# Allegro board T527-DEMO-AXP717B-LPDDR4-32X1-V1-0_1213.brd

Outline 246.2 x 143.31 mm; copper layers: TOP, L2GND, L3, L4, L5GND, BOTTOM. Coordinates in mm from the lower left corner of the outline.
Outline path: 0,141.78 0,1.52 ; 0,141.78 arc(0.45,142.86) 1.52,143.31 199.51,143.31 ; 0,141.78 0,1.52 ; 0,1.52 arc(0.45,0.45) 1.52,0 ; 1.52,0 244.68,0 ; 1.52,0 244.68,0 ; 244.68,0 arc(245.75,0.45) 246.2,1.52 ; 244.68,0 arc(245.75,0.45) 246.2,1.52 ; 199.51,143.31 198.85,143.31 ; 199.51,143.31 199.51,139.11 ; 209.68,143.31 244.68,143.31 ; 244.68,143.31 arc(245.75,142.86) 246.2,141.78 ; 244.68,143.31 arc(245.75,142.86) 246.2,141.78 ; 246.2,141.78 246.2,1.52 ; 246.2,141.78 246.2,1.52

## Design rules (mm)
net group 3V3-STBY: nets EXT-3V3 N23534299
net group ALDO-OUT: nets ALDO-OUT VRP
net group AUDIO-MUTE: nets AUDIO-MUTE S-AMP-MUTE
net group AUDIO-PWR-EN: nets AUDIO-PWR-EN N20492605
net group BLDO2: nets BLDO2 N22958105
net group CLKOUT-125M: nets CLKOUT-125M RGMII0-CLKIN-125M
net group CTP0-RST: nets CTP0-RST N19388835
net group CTP1-RST: nets CTP1-RST N20736023
net group DCXO-XOUT: nets DCXO-XOUT N16421057
net group DIFFPAIR44: nets USB3-TXN USB3-TXP
net group DIFFPAIR96: nets SPKL+ SPKL-
net group DIFFPAIR97: nets SPKR+ SPKR-
net group DIFFPAIR101: nets LINEINL LINEINR
net group DIFFPAIR102: nets MICIN2N-AC107 MICIN2P-AC107
net group DP-AUXN-1: nets DP-AUXN-1 EDP-AUXN
net group DP-AUXP-1: nets DP-AUXP-1 EDP-AUXP
net group DP-TX0N-1: nets DP-TX0N-1 EDP-TX0N
net group DP-TX0P-1: nets DP-TX0P-1 EDP-TX0P
net group DP-TX1N-1: nets DP-TX1N-1 EDP-TX1N
net group DP-TX1P-1: nets DP-TX1P-1 EDP-TX1P
net group DP-TX2N-1: nets DP-TX2N-1 EDP-TX2N
net group DP-TX2P-1: nets DP-TX2P-1 EDP-TX2P
net group DP-TX3N-1: nets DP-TX3N-1 EDP-TX3N
net group DP-TX3P-1: nets DP-TX3P-1 EDP-TX3P
net group DVDD: nets DVDD VCC-1V8-AUDIO
net group EPHY-CLK-25M: nets EPHY-CLK-25M XTAL-25MOUT
net group HUB-IN-DM: nets HUB-IN-DM USB1-DM
net group HUB-IN-DP: nets HUB-IN-DP USB1-DP
net group HUB-XOUT: nets HUB-XOUT N23982160
net group I2S2-MCLK: nets I2S2-MCLK N20684047
net group LCD0-BL-PWREN: nets LCD0-BL-PWREN N19388067
net group LCD1-BL-PWREN: nets LCD1-BL-PWREN N19393896
net group LED0/CFG-EXT: nets LED0/CFG-EXT N19421144
net group LED1/CFG-LDO0: nets LED1/CFG-LDO0 N19421140
net group LED2/CFG-LDO1: nets LED2/CFG-LDO1 N19421205
net group M-PWRON-AP: nets M-PWRON-AP PWRON
net group MCSIA-MCLK: nets MCSIA-MCLK N19709323
net group MCSIC-MCLK: nets MCSIC-MCLK N17807603
net group MDC: nets MDC RGMII0-MDC
net group MDIO: nets MDIO RGMII0-MDIO
net group NRE: nets N17079515 NRE
net group PCIE21-TDN: nets N21159878 PCIE21-TDN
net group PCIE21-TDP: nets N21159841 PCIE21-TDP
net group RGMII0-TXCK: nets RGMII0-TXCK TXC
net group RGMII0-TXCTL: nets RGMII0-TXCTL TXCTL
net group RGMII0-TXD0: nets RGMII0-TXD0 TXD0
net group RGMII0-TXD1: nets RGMII0-TXD1 TXD1
net group RGMII0-TXD2: nets RGMII0-TXD2 TXD2
net group RGMII0-TXD3: nets RGMII0-TXD3 TXD3
net group SDC0-CLK: nets N17806711 SDC0-CLK
net group VCC33-18-USB: nets VCC33-18-USB VCC33-USB
net group VCC-ADC: nets VCC-ADC VREFP-ADC
net group VCC-FLASH: nets VCC-FLASH VCC-PC
net group VCC-PD: nets VCC-PD VCCIO-LCD0
net group VCC-PJ: nets VCC-PJ VCCIO-LCD1
net group WIFI-XTAL-OUT: nets N16813673 WIFI-XTAL-OUT
net group WL-SDIO-CLK: nets N18665573 WL-SDIO-CLK
net group WREQIN: nets N17685568 WREQIN
net group 4-4: nets LINEOUT-DSP-LN LINEOUT-DSP-LP LINEOUT-DSP-RN LINEOUT-DSP-RP LINEOUTLN LINEOUTLP LINEOUTRN LINEOUTRP MICIN1N MICIN1N-AC107 MICIN1N-MIC MICIN1P MICIN1P-AC107 MICIN1P-MIC MICIN2N MICIN2N-MIC MICIN2P MICIN2P-MIC MICIN3N MICIN3P
net group ANT0: nets ANT0 N16794099 N16811138 N16811149 N16811502
net group AP-CK24M-OUT: nets AP-CK24M-OUT N16800403 XTAL2
net group AP-CK32K-OUT: nets AP-CK32K-OUT LPCLK N16805924
net group BUSJ: nets BUSJ VBUSM VD33 XRSTJ
net group DIFF90: nets D+ D- HUB-DM1 HUB-DM2 HUB-DM3 HUB-DM4 HUB-DP1 HUB-DP2 HUB-DP3 HUB-DP4 N17311481 N17311494 N23159079 N23159094 N23159172 N23159176 USB0-DM USB0-DP USB2-DM USB2-DP USB3-RXN USB3-RXP USB3-TXN-1 USB3-TXP-1
net group DIFF100: nets N19462537 N19462549 N19462627 N19462788 N20900734 N20900736 N20900899 N20900901 N20913593 N20913596 N22323807 U3-PCIE21-RXN U3-PCIE21-RXP U3-PCIE21-TXN U3-PCIE21-TXP
net group DVDDRG: nets DVDDRG RGMII0-RXCK RGMII0-RXCTL RGMII0-RXD0 RGMII0-RXD1 RGMII0-RXD2 RGMII0-RXD3 RXC/PHYAD1 RXCTL/PHYAD2 RXD0/RXDLY RXD1/TXDLY RXD2/PLLOFF RXD3/PHYAD0
net group HDMI: nets HTX0N HTX0P HTX1N HTX1P HTX2N HTX2P HTXCN HTXCP
net group HPOUTL: nets HPOUTL N20133630 N21757000
net group HPOUTR: nets HPOUTR N20133649 N21756998
net group LTE-PWR: nets N19376562
net group LVDS1_D: nets LVDS1-CKN LVDS1-CKP LVDS1-D1N LVDS1-D1P LVDS1-D2N LVDS1-D2P LVDS1-D3N LVDS1-D3P
net group LVDS3_D: nets LVDS3-CKN LVDS3-CKP LVDS3-D1N LVDS3-D1P LVDS3-D2N LVDS3-D2P LVDS3-D3N LVDS3-D3P
net group MCSIA_D: nets MCSIA-CKN MCSIA-CKP MCSIA-D0N MCSIA-D0P MCSIA-D1N MCSIA-D1P MCSIB-D0N MCSIB-D0P MCSIB-D1N MCSIB-D1P
net group MCSID_D: nets MCSIC-CKN MCSIC-CKP MCSIC-D0N MCSIC-D0P MCSIC-D1N MCSIC-D1P MCSID-D0N MCSID-D0P MCSID-D1N MCSID-D1P
net group N16811571: nets N16811571 N16811677 N16811938
net group NCSI-D8: nets N20492599 N20684050 PCMCLK
net group NCSI-D9: nets N20492596 N20683982 PCMSYNC
net group NCSI-D10: nets N20492590 N20683985 PCMDOUT
net group NCSI-D11: nets N20492593 N22106739 PCMDI
net group PCIE21-REFCLKN: nets N18188508 N19487540 PCIE21-REFCLKN
net group PCIE21-REFCLKP: nets N18188505 N19487538 PCIE21-REFCLKP
net group PCIE-M2-RDN: nets PCIE21-RDN PCIE21-RDN-R PCIE-M2-RDN
net group PCIE-M2-RDP: nets PCIE21-RDP PCIE21-RDP-R PCIE-M2-RDP
net group SW-OUT: nets N17877662
net group VCC-3V3-PCIE: nets N19487589
net group VCC-CTP: nets VCC-CTP VCC-CTP0 VCC-CTP1

## Placement (name value [footprint] x y rotation side)
ANT3  GPS-ANT  [ANT3B300_310H125]  119.38 140.97 180 top
ANT4  NC/Antenna_SW4_SMD  [SMA5B700_1500H986]  27.05 142.37 0 top
ANT5  NC/Antenna_SW4_SMD  [SMA5B700_1500H986]  17.27 142.37 0 top
B1  600R-100M  [L0603]  74.42 132.08 270 bottom
B2  600R-100M  [L0603]  73.15 137.03 90 top
B3  600R-100M  [L0603]  71.75 137.03 90 top
B4  600R-100M  [L0603]  63.12 137.03 90 top
B5  600R-100M  [L0603]  61.72 137.03 90 top
BT1  test  [TP100]  9.4 125.31 0 top
BT2  test  [TP100]  9.45 127.81 0 top
BT3  test  [TP100]  9.48 122.62 0 top
BT4  NC/CR2032-8  [CR2B2000_2850H550]  39.22 89.51 90 bottom
C1  2.2uF  [C0402]  125.63 77.29 90 bottom
C2  100nF  [C0402]  124.8 77.29 90 bottom
C3  22uF  [C0603]  142.37 66.93 225 bottom
C4  4.7uF  [C0402]  133.73 75.61 90 bottom
C5  4.7uF  [C0402]  135.8 75.76 90 bottom
C6  2.2uF  [C0402]  132.86 75.6 90 bottom
C7  100nF  [C0402]  140.99 74.92 90 bottom
C8  22uF  [C0603]  144.18 74.57 45 bottom
C9  2.2uF  [C0402]  136.2 69.04 180 bottom
C10  100nF  [C0402]  134.99 75.76 90 bottom
C11  22uF  [C0603]  132.21 62.61 180 bottom
C12  22uF  [C0603]  132.21 63.88 180 bottom
C13  4.7uF  [C0402]  132.33 66.89 180 bottom
C14  4.7uF  [C0402]  132.05 75.39 90 bottom
C15  2.2uF  [C0402]  131.15 73.81 180 bottom
C16  2.2uF  [C0402]  131.24 75.46 90 bottom
C17  100nF  [C0402]  136.17 67.73 0 bottom
C18  100nF  [C0402]  132.32 65.9 180 bottom
C19  100nF  [C0402]  139.19 56.39 270 bottom
C20  100nF  [C0402]  111.51 73.53 0 top
C21  1uF  [C0402]  109.6 70.1 270 top
C22  100nF  [C0402]  111.51 72.14 0 top
C23  1nF  [C0402]  111.12 86.23 0 top
C24  1nF  [C0402]  112.9 82.68 90 top
C25  22uF  [C0603]  140.79 81.14 90 bottom
C26  2.2uF  [C0402]  135.69 78.91 90 bottom
C27  2.2uF  [C0402]  136.53 78.92 90 bottom
C28  100nF  [C0402]  140.88 77.64 270 bottom
C29  100nF  [C0402]  133.51 76.97 180 bottom
C30  18pF-C0G  [C0402]  117.35 81.53 90 top
C31  22pF-C0G  [C0402]  116.46 83.57 180 top
C32  22uF  [C0603]  141.29 83.96 180 bottom
C33  100nF  [C0402]  140.38 82.92 180 bottom
C34  18pF-C0G  [C0402]  117.35 79.63 270 top
C35  22pF-C0G  [C0402]  116.33 86.49 0 top
C36  22uF  [C0603]  138.9 66.61 225 bottom
C37  100nF  [C0402]  138.18 67.33 225 bottom
C38  22uF  [C0603]  131.19 91.31 180 bottom
C39  2.2uF  [C0402]  131.19 90.17 180 bottom
C40  2.2uF  [C0402]  133.5 79.55 315 bottom
C41  100nF  [C0402]  132.87 78.3 270 bottom
C42  100nF  [C0402]  134.24 80.31 315 bottom
C43  22uF  [C0603]  117.09 82.04 90 bottom
C44  2.2uF  [C0402]  131.19 78.48 0 bottom
C45  2.2uF  [C0402]  131.2 77.21 0 bottom
C46  100nF  [C0402]  129.88 77.08 270 bottom
C47  100nF  [C0402]  130.98 79.99 0 bottom
C49  10uF  [C0402]  135.84 71.7 270 bottom
C50  100nF  [C0402]  140.72 64.26 135 bottom
C51  100nF  [C0402]  141.6 65.15 135 bottom
C54  100nF  [C0402]  137.54 96.01 90 bottom
C55  1uF  [C0402]  147.83 82.04 270 bottom
C56  100nF  [C0402]  146.56 82.3 270 bottom
C57  100nF  [C0402]  136.55 83.87 90 bottom
C58  100nF  [C0402]  149.86 81.15 90 bottom
C59  100nF  [C0402]  123.92 75.88 270 bottom
C60  10uF  [C0603]  135.51 90.3 180 bottom
C61  100nF  [C0402]  133.73 89.66 90 bottom
C62  100nF  [C0402]  135.49 83.92 90 bottom
C64  100nF  [C0402]  121.82 82.85 315 bottom
C65  100nF  [C0402]  122.56 86.11 45 bottom
C66  2.2uF  [C0402]  127.8 81.14 270 bottom
C67  2.2uF  [C0402]  125.31 83.34 225 bottom
C68  470nF  [C0402]  130.52 83.38 180 bottom
C69  2.2uF  [C0402]  130.99 84.73 270 bottom
C70  2.2uF  [C0402]  128.75 84.91 270 bottom
C71  470nF  [C0402]  125.66 86.03 135 bottom
C72  470nF  [C0402]  125.09 85.45 135 bottom
C73  470nF  [C0402]  127.69 84.89 270 bottom
C74  10uF  [C0603]  124.8 81.71 315 bottom
C75  2.2uF  [C0402]  124.74 83.91 225 bottom
C76  100nF  [C0402]  147.03 74.75 225 bottom
C77  100nF  [C0402]  151.47 74.12 45 bottom
C78  100nF  [C0402]  142.51 76.34 315 bottom
C79  1uF  [C0402]  151.38 77.47 90 bottom
C80  1uF  [C0402]  153.16 76.71 90 bottom
C81  100nF  [C0402]  154.05 76.71 90 bottom
C82  100nF  [C0402]  152.27 77.47 90 bottom
C83  1uF  [C0402]  148.34 79.76 90 bottom
C84  1uF  [C0402]  147.45 79.76 90 bottom
C85  100nF  [C0402]  145.67 79.76 90 bottom
C86  100nF  [C0402]  146.56 79.76 90 bottom
C87  1uF  [C0402]  141.22 59.94 180 bottom
C88  1uF  [C0402]  141.22 59.05 180 bottom
C89  100nF  [C0402]  141.22 60.83 180 bottom
C90  100nF  [C0402]  141.22 61.72 180 bottom
C91  1uF  [C0402]  143.55 60.83 0 bottom
C92  1uF  [C0402]  143.55 59.05 0 bottom
C93  100nF  [C0402]  143.55 59.94 0 bottom
C94  100nF  [C0402]  143.55 61.72 0 bottom
C95  1uF  [C0402]  152.26 68.39 45 bottom
C96  1uF  [C0402]  152.89 67.76 45 bottom
C97  100nF  [C0402]  153.52 67.13 45 bottom
C98  100nF  [C0402]  151.64 69.02 45 bottom
C99  1uF  [C0402]  148.25 71.96 135 bottom
C100  1uF  [C0402]  150.32 71.17 315 bottom
C101  100nF  [C0402]  149.69 70.53 315 bottom
C102  100nF  [C0402]  148.89 72.6 135 bottom
C103  100nF  [C0402]  135.25 13.34 270 top
C104  100nF  [C0402]  133.48 13.34 270 top
C105  100nF  [C0402]  134.37 13.34 270 top
C106  100nF  [C0402]  132.59 13.34 270 top
C107  100nF  [C0402]  131.7 13.34 270 top
C108  100nF  [C0402]  130.81 13.34 270 top
C109  100nF  [C0402]  129.92 13.34 270 top
C110  100nF  [C0402]  129.03 13.34 270 top
C111  100nF  [C0402]  137.03 13.34 270 top
C112  100nF  [C0402]  137.92 13.34 270 top
C113  4.7uF  [C0603]  142.24 11.43 90 top
C117  1nF  [C0402]  84.2 26.16 270 top
C118  10nF  [C0402]  132.2 85.59 270 bottom
C119  1nF  [C0402]  133.56 84.58 180 bottom
C133  2.2uF  [C0402]  128.4 96.39 270 top
C134  100nF  [C0402]  154.81 72.26 0 top
C135  100nF  [C0402]  154.81 71.37 0 top
C139  100nF  [C0402]  145.59 73.79 315 bottom
C140  100nF  [C0402]  143.78 75.74 225 bottom
C142  100nF  [C0402]  184.78 45.85 180 top
C143  NC/4.7uF  [C0603]  51.94 129.16 0 top
C144  NC/4.7uF  [C0603]  51.94 127.89 0 top
C150  10uF  [C0603]  43.94 112.65 180 top
C151  100nF  [C0402]  43.94 113.79 180 top
C152  1uF  [C0402]  40.89 110.24 270 top
C153  NC-100nF  [C0402]  35.81 32.26 90 top
C154  100nF-50V  [C0603]  36.07 14.86 90 top
C155  100nF-50V  [C0402]  32.89 21.08 270 top
C156  NC-100nF-25V  [C0402]  39.12 36.58 270 top
C157  NC-100nF-25V  [C0402]  73.91 50.93 0 top
C158  100nF  [C0402]  61.72 27.56 180 top
C159  100nF  [C0402]  59.56 24.26 90 top
C160  NC-100nF-25V  [C0402]  40.01 34.67 90 top
C163  10uF-16V  [C0805]  91.82 12.83 90 top
C164  100nF-16V  [C0402]  90.42 12.95 90 top
C242  NC-1nF-50V  [C0402]  45.47 36.96 0 top
C402  0.1uF  [C0402]  10.54 69.85 90 top
C403  0.1uF  [C0402]  100.84 57.15 0 top
C404  0.22uF  [C0402]  11.94 60.2 180 top
C405  0.1uF  [C0402]  9.4 69.85 90 top
C406  0.1uF  [C0402]  8.38 69.85 90 top
C407  0.1uF  [C0402]  7.49 69.85 270 top
C438  100nF  [C0402]  78.49 138.94 90 top
C439  100nF  [C0402]  138.99 84.01 0 bottom
C440  100nF  [C0402]  130.56 58.8 180 top
C441  100nF  [C0402]  120.78 82.68 315 bottom
C442  10uF-50V  [C0603]  171.58 78.99 270 top
C443  1uF-50V  [C0402]  172.72 78.99 270 top
C446  100nF  [C0402]  200.66 52.58 270 top
C447  100nF  [C0402]  201.8 52.58 270 top
C448  NC/224  [C0402]  95.63 57.15 0 top
C449  100nF-16V  [C0402]  54.99 99.57 90 top
C450  18pF  [C0402]  63.75 103.63 90 top
C451  18pF  [C0402]  63.75 99.82 270 top
C452  4.7uF  [C0603]  54.48 28.19 90 top
C453  100nF  [C0402]  42.67 26.04 0 bottom
C454  100nF  [C0402]  48.9 24.38 270 bottom
C455  100nF  [C0402]  48.13 16.64 0 top
C456  1uF  [C0402]  51.82 25.78 0 top
C457  20pF  [C0402]  51.82 24.64 0 top
C458  4.7uF  [C0603]  41.02 20.95 270 bottom
C459  100nF  [C0402]  51.82 19.56 180 top
C460  100nF  [C0402]  48.13 17.53 180 top
C461  1uF  [C0402]  49.78 24.38 90 bottom
C462  100nF  [C0402]  42.67 27.3 180 bottom
C463  4.7uF  [C0603]  54.86 127.89 180 top
C464  4.7uF  [C0603]  54.86 129.16 180 top
C465  1nF  [C0402]  147.57 78.36 0 bottom
C466  100nF  [C0402]  178.56 15.11 270 top
C467  100nF  [C0402]  179.45 15.11 270 top
C468  1nF  [C0402]  84.33 39.37 0 top
C469  100nF  [C0402]  226.19 137.54 180 top
C470  4.7uF  [C0603]  225.93 136.4 180 top
C471  10uF-16V  [C0603]  146.81 11.18 0 top
C472  1uF-16V  [C0402]  146.81 10.03 0 top
C473  1uF-50V  [C0402]  186.06 77.72 270 top
C474  10uF-50V  [C0603]  187.2 77.72 270 top
C475  100nF  [C0402]  186.56 71.88 0 top
C476  4.7uF  [C0603]  186.18 73.79 90 top
C477  4.7uF  [C0603]  170.31 74.3 180 top
C478  100nF  [C0402]  170.81 73.28 180 top
C479  100nF  [C0402]  141.1 11.18 270 top
C480  1uF  [C0402]  150.16 116.59 180 top
C481  10uF  [C0603]  146.2 112.62 270 top
C482  100nF  [C0402]  147.24 112.65 270 top
C483  1uF  [C0402]  220.65 47.68 270 top
C484  10uF  [C0603]  222.88 43.94 270 top
C485  100nF  [C0402]  224.92 44.32 270 top
C486  10uF  [C0603]  147.8 120.7 180 top
CA1  1uF  [C0402]  102.36 132.46 270 top
CA2  33pF  [C0402]  103.76 135.64 180 top
CA5  100nF  [C0402]  88.65 126.75 180 top
CA6  100nF  [C0402]  92.58 126.75 0 top
CA7  100nF  [C0402]  104.27 132.46 90 top
CA8  10uF  [C0603]  104.65 133.86 180 bottom
CA9  100pF  [C0402]  104.78 134.75 180 top
CA10  100nF  [C0402]  105.28 132.46 90 top
CA11  33pF  [C0402]  105.66 135.64 180 top
CA13  1uF  [C0402]  96.01 132.46 270 top
CA17  33pF  [C0402]  97.41 135.64 180 top
CA18  100nF  [C0402]  97.92 132.46 90 top
CA20  10uF  [C0603]  98.3 133.86 180 bottom
CA21  100pF  [C0402]  98.42 134.75 180 top
CA24  100nF  [C0402]  98.93 132.46 90 top
CA25  33pF  [C0402]  99.31 135.64 180 top
CA31  22nF  [C0402]  90.68 119.89 90 top
CA32  NC/470nF  [C0402]  92.08 120.4 0 top
CA33  NC  [C0402]  88.9 120.9 270 top
CA34  0.22uF  [C0402]  71.75 127.89 270 top
CA35  NC/470nF  [C0402]  92.08 121.41 0 top
CA36  1uF-16V  [C0402]  72.39 132.59 180 bottom
CA37  22uF-16V  [C0603]  72.39 131.44 180 bottom
CA38  22nF  [C0402]  90.68 121.92 90 top
CA39  100nF  [C0402]  72.64 125.98 270 top
CA40  100nF  [C0402]  73.66 125.98 270 top
CA41  22nF  [C0402]  90.68 117.22 270 top
CA42  0.22uF  [C0402]  61.72 127.89 270 top
CA43  NC/470nF  [C0402]  92.08 116.71 0 top
CA44  NC  [C0402]  88.9 116.2 90 top
CA45  1uF-16V  [C0402]  62.36 132.59 180 bottom
CA46  22uF-16V  [C0603]  62.36 131.44 180 bottom
CA47  NC/470nF  [C0402]  92.08 115.7 0 top
CA48  100nF  [C0402]  62.61 125.98 270 top
CA49  100nF  [C0402]  63.63 125.98 270 top
CA50  22nF  [C0402]  90.68 115.19 270 top
CA51  2.2uF  [C0402]  57.78 122.94 270 top
CA52  2.2uF  [C0402]  56.9 122.94 270 top
CA53  2.2uF  [C0402]  47.12 121.41 0 top
CA54  2.2uF  [C0402]  47.12 120.52 0 top
CA55  100nF  [C0402]  60.71 116.33 180 top
CA56  2.2uF  [C0402]  60.71 114.17 0 top
CA57  100nF  [C0402]  60.71 118.11 180 top
CA58  1uF  [C0402]  53.09 122.94 90 top
CA59  1uF  [C0402]  52.2 122.94 90 top
CA60  1uF  [C0402]  51.31 122.94 90 top
CA61  2.2uF  [C0402]  55.75 122.94 270 top
CA62  1uF  [C0402]  50.42 122.94 90 top
CA63  2.2uF  [C0402]  54.86 122.94 270 top
CA64  100nF-16V  [C0402]  53.98 120.14 90 bottom
CA65  1uF-16V  [C0402]  53.09 120.14 90 bottom
CA66  10uF-16V  [C0603]  51.94 119.76 270 bottom
CA89  1uF-50V  [C0402]  23.88 85.6 90 top
CA90  1nF  [C0402]  26.04 91.57 90 top
CA91  1nF  [C0402]  26.04 93.6 270 top
CA92  1uF  [C0603]  24.13 91.95 180 top
CA93  1uF  [C0603]  24.13 93.22 180 top
CA94  1uF  [C0603]  24.13 96.27 180 top
CA95  1uF  [C0603]  24.13 97.54 180 top
CA96  4.7uF  [C0603]  24.13 98.81 180 top
CA97  1nF  [C0402]  26.21 97.82 270 top
CA98  1nF  [C0402]  26.21 95.91 90 top
CA99  1uF-50V  [C0402]  31.24 83.31 90 top
CA100  1uF  [C0402]  24.13 101.85 0 top
CA101  100nF  [C0402]  94.49 121.67 180 top
CA102  1uF  [C0402]  95.63 115.57 270 top
CA103  100nF  [C0402]  92.08 117.73 180 top
CA104  100nF  [C0402]  99.57 119.89 90 top
CA105  1uF  [C0402]  92.08 118.62 180 top
CA106  1uF  [C0402]  92.08 119.51 180 top
CA107  100nF  [C0402]  99.57 117.98 270 top
CA108  1uF  [C0402]  98.68 117.98 270 top
CA109  1uF  [C0402]  92.08 122.43 180 top
CA110  1uF  [C0402]  98.68 119.89 90 top
CA117  470nF  [C0402]  87.12 120.4 180 bottom
CA118  470nF  [C0402]  87.12 121.41 180 bottom
CA122  1uF  [C0402]  60.58 119.89 0 top
CA123  2.2uF-16V  [C0402]  53.98 122.94 270 top
CA124  100nF  [C0402]  60.71 115.44 180 top
CA125  100nF  [C0402]  60.71 117.22 180 top
CB1  100nF  [C0402]  213.87 66.93 270 top
CB2  4.7uF  [C0603]  193.8 67.94 270 top
CB3  22uF  [C0603]  195.07 67.94 270 top
CB4  NC/100nF  [C0402]  200.66 53.47 90 top
CB5  NC/100nF  [C0402]  201.8 53.47 90 top
CB8  100nF  [C0402]  196.34 67.94 270 top
CB9  4.7uF  [C0603]  212.6 67.18 270 top
CC1  100nF  [C0402]  227.2 110.74 270 top
CC2  4.7uF  [C0603]  217.3 18.54 180 top
CC3  100nF  [C0402]  227.2 56.64 270 top
CC4  10uF  [C0603]  226.06 56.64 270 top
CC5  100nF  [C0402]  227.2 113.16 270 top
CC6  100nF  [C0402]  227.2 59.05 270 top
CC9  100nF-16V  [C0402]  227.2 115.7 270 top
CC10  100nF-16V  [C0402]  227.2 61.59 270 top
CC11  10uF-16V  [C0603]  226.06 61.59 270 top
CC12  10uF-16V  [C0603]  226.06 115.7 270 top
CC13  100nF  [C0402]  227.2 65.53 270 top
CC14  100nF  [C0402]  227.2 119.63 270 top
CC15  10uF  [C0603]  226.06 119.76 270 top
CC16  10uF  [C0603]  226.06 65.66 270 top
CC28  100nF-16V  [C0402]  51.94 16.76 180 top
CC29  1uF-16V  [C0402]  51.94 17.78 180 top
CC30  100nF  [C0402]  61.47 16.38 180 top
CC31  NC/4.7nF  [C0402]  61.98 17.78 270 top
CC32  100nF-16V  [C0402]  66.67 27.43 90 top
CC33  1uF-16V  [C0402]  65.79 27.43 90 top
CC34  100nF  [C0402]  64.77 18.29 180 top
CC35  NC/4.7nF  [C0402]  67.69 15.62 90 top
CC36  100nF-16V  [C0402]  72.14 27.43 90 top
CC37  1uF-16V  [C0402]  71.25 27.43 90 top
CC38  100nF  [C0402]  69.98 18.29 0 top
CC39  NC/4.7nF  [C0402]  73.03 15.62 90 top
CC40  10uF  [C0603]  226.06 110.74 270 top
CD1  10uF  [C0603]  124.3 65.14 45 top
CD2  10uF  [C0603]  109.03 60.52 315 top
CD3  2.2uF  [C0402]  114.88 63.19 45 bottom
CD4  2.2uF  [C0402]  124.87 71.72 270 bottom
CD5  2.2uF  [C0402]  123.4 62.21 135 bottom
CD6  2.2uF  [C0402]  128.05 67.56 180 bottom
CD7  2.2uF  [C0402]  123.62 57.69 45 bottom
CD8  2.2uF  [C0402]  116.3 67.23 45 bottom
CD9  100nF  [C0402]  113.69 58.94 225 bottom
CD10  100nF  [C0402]  124.92 74.61 90 bottom
CD11  100nF  [C0402]  120.13 57.86 315 bottom
CD12  100nF  [C0402]  121.97 63.49 225 bottom
CD13  10uF  [C0603]  113.02 56.37 135 top
CD14  2.2uF  [C0402]  129.92 72.39 90 bottom
CD15  2.2uF  [C0402]  129.59 75.77 0 bottom
CD16  100nF  [C0402]  129.45 74.83 0 bottom
CD17  100nF  [C0402]  130.78 72.39 90 bottom
CD18  2.2uF  [C0402]  125.63 64.94 225 top
CD19  100nF  [C0402]  126.25 64.37 225 top
CD20  2.2uF  [C0402]  112.22 57.21 225 bottom
CD21  100nF  [C0402]  121.57 61.99 180 bottom
CE1  100nF  [C0402]  215.77 41.27 0 bottom
CE2  100nF  [C0402]  215.9 37.08 270 bottom
CE3  100nF  [C0402]  208.79 42.93 0 top
CE4  100nF  [C0402]  210.06 37.72 270 bottom
CE5  100nF  [C0402]  211.71 37.08 270 bottom
CE6  NC-100nF  [C0402]  210.44 35.05 90 bottom
CE7  4.7uF  [C0603]  203.84 34.42 0 top
CE8  100nF  [C0402]  203.84 35.56 0 top
CE9  100nF  [C0402]  214.76 36.58 270 bottom
CE10  100nF  [C0402]  217.68 37.21 90 bottom
CE11  100nF  [C0402]  217.68 40.26 270 bottom
CE12  100nF  [C0402]  224.03 44.32 90 top
CE13  4.7uF  [C0603]  221.49 43.94 90 top
CE14  NC-100nF  [C0402]  229.49 23.11 180 top
CE15  NC-22PF  [C0402]  213.36 31.75 90 top
CE16  1nF-2KV  [C1206]  233.68 6.35 0 top
CE17  100nF  [C0402]  216.03 43.18 270 top
CE18  NC-22PF  [C0402]  162.38 77.98 270 bottom
CE19  NC-1nF  [C0402]  229.49 11.3 180 top
CE20  NC-22PF  [C0402]  206.76 36.96 270 top
CE21  NC-1nF  [C0402]  229.49 16.76 180 top
CE22  NC-1nF  [C0402]  229.49 19.94 180 top
CE23  NC-1nF  [C0402]  227.2 22.23 0 top
CE24  NC-20pF  [C0402]  215.01 34.29 0 top
CE25  NC-20pF  [C0402]  216.92 34.29 180 top
CE26  NC-100PF  [C0402]  210.31 31.75 90 top
CE27  NC-100PF  [C0402]  211.33 31.75 90 top
CE28  NC-100PF  [C0402]  212.34 31.75 90 top
CE29  20pF  [C0402]  58.17 109.98 0 top
CE30  20pF  [C0402]  60.07 109.98 180 top
CG1  NC  [C0402]  118.96 134.62 0 top
CG2  NC  [C0402]  118.96 137.41 0 top
CG3  100nF  [C0402]  119.63 121.03 270 top
CG4  10nF  [C0402]  120.9 130.05 180 top
CG5  100nF  [C0402]  104.27 117.35 0 top
CG6  100nF  [C0402]  104.27 115.57 0 top
CG7  100nF  [C0402]  119.63 124.84 90 top
CH1  100nF-16V  [C0402]  191.64 15.11 180 top
CH2  NC/pF  [C0402]  194.82 14.1 0 top
CH3  NC/pF  [C0402]  197.1 14.1 0 top
CH4  10uF-16V  [C0603]  189.48 23.88 180 top
CH5  100nF-16V  [C0402]  189.48 21.84 180 top
CH6  1uF-16V  [C0402]  189.48 29.34 180 top
CH7  100nF  [C0402]  130.05 101.98 0 top
CL1  100nF-16V  [C0402]  115.4 20.12 180 top
CL2  1uF-50V  [C0805]  98.09 39.65 180 top
CL3  22uF-16V  [C0603]  115.27 22.28 180 top
CL4  100nF  [C0402]  120.73 9.83 270 top
CL5  100nF-50V  [C0402]  118.57 19.86 180 top
CL6  10uF-50V  [C0603]  118.57 22.28 180 top
CL7  22uF-50V  [C0603]  118.57 21.01 180 top
CL8  100nF  [C0402]  122.64 9.83 270 top
CL9  100nF  [C0402]  88.9 34.67 0 top
CL10  1uF-50V  [C0402]  117.6 31.75 0 top
CL11  10uF-50V  [C0603]  118.11 36.2 180 top
CL12  100nF-50V  [C0402]  118.11 38.35 180 top
CL13  100nF  [C0402]  126.75 40.39 90 top
CL14  100nF  [C0402]  160.91 133.86 90 top
CL15  100nF  [C0402]  159.51 133.1 0 top
CL16  100nF  [C0402]  175.39 93.22 90 top
CL17  1uF-50V  [C0402]  156.46 119.51 180 top
CL18  10uF-50V  [C0603]  156.34 114.81 0 top
CL19  100nF-50V  [C0402]  156.34 113.67 0 top
CL20  100nF  [C0402]  148.46 122.94 270 top
CL60  1uF-16V  [C0402]  115.4 21.01 180 top
CL61  100nF-16V  [C0402]  165.23 123.32 270 top
CL62  1uF-16V  [C0402]  164.34 123.32 270 top
CL63  22uF-16V  [C0603]  162.56 123.57 180 top
CL64  100nF-50V  [C0402]  159.51 123.7 0 top
CL65  10uF-50V  [C0603]  159.51 121.28 0 top
CL66  22uF-50V  [C0603]  159.51 122.56 0 top
CL67  100nF-50V  [C0402]  97.82 40.67 180 bottom
CL68  10uF-16V  [C0603]  98.02 42.11 180 top
CL69  1nF-16V  [C0402]  97.97 41.07 180 top
CM1  100nF  [C0402]  146.18 48.9 270 bottom
CM2  1uF  [C0402]  133.99 50.04 180 bottom
CM3  1uF  [C0402]  140.84 52.32 0 bottom
CM4  100nF  [C0402]  140.84 53.21 0 bottom
CM6  1uF  [C0402]  127.64 48.51 270 bottom
CM7  20pF  [C0402]  51.82 22.86 180 top
CM8  100nF  [C0402]  132.08 51.44 90 bottom
CM9  100nF  [C0402]  125.86 53.34 270 top
CM10  100nF  [C0402]  127.64 43.18 90 bottom
CM11  100nF  [C0402]  137.29 48.13 270 bottom
CM12  100nF  [C0402]  146.18 46.99 90 bottom
CM13  100nF  [C0402]  139.19 49.53 90 bottom
CM21  100nF  [C0402]  135.89 46.23 0 bottom
CM22  100nF  [C0402]  129.54 44.7 0 bottom
CON4  NC/CON1X4-2.54-F-DIP  [SKT1_4P254B250_1036H850]  32.38 10.79 0 top
CON7  CON_4P_2R54_PH  [HDR1_4P254B250_1016H254]  1.91 55.12 270 top
CON8  CON_4P_2R54_PH  [HDR1_4P254B250_1016H254]  1.91 67.69 90 top
CON10  CON_4P_2R54_PH  [HDR1_4P254B250_1016H254]  99.06 67.31 180 top
CON11  CON_4P_2R54_PH  [HDR1_4P254B250_1016H254]  99.06 62.61 180 top
CP1  100nF  [C0402]  65.91 79.88 270 top
CP2  22uF  [C0603]  70.87 75.08 0 top
CP3  1uF  [C0402]  72.64 85.72 0 top
CP4  NC/22uF  [C0603]  70.87 73.81 0 top
CP5  1uF  [C0402]  67.31 92.33 90 top
CP6  NC/10uF  [C0603]  59.94 76.91 180 top
CP7  22uF  [C0603]  65.53 94.87 0 top
CP8  NC/22uF  [C0603]  65.53 96.27 0 top
CP9  10uF  [C0603]  59.94 78.46 180 top
CP10  22uF  [C0603]  62.1 84.45 90 top
CP11  1uF  [C0402]  72.39 81.79 315 top
CP12  NC/10uF  [C0603]  60.83 84.45 90 top
CP13  NC/10uF  [C0603]  59.56 84.45 90 top
CP14  22uF  [C0603]  54.99 85.47 90 top
CP16  22uF  [C0603]  68.71 96.65 90 top
CP17  22uF  [C0603]  53.72 85.47 90 top
CP18  NC/22uF  [C0603]  55.63 89.66 180 top
CP19  2.2uF  [C0402]  71.88 92.96 0 top
CP20  4.7uF  [C0402]  58.62 90.09 180 top
CP21  1uF  [C0402]  66.93 82.68 180 bottom
CP22  NC/100nF  [C0402]  58.62 91.08 180 top
CP23  1uF  [C0402]  62.87 97.03 180 top
CP24  1uF  [C0402]  67.82 79.88 270 top
CP25  2.2uF  [C0402]  72.9 79.25 0 top
CP26  2.2uF  [C0402]  74.8 79.25 0 top
CP27  2.2uF  [C0402]  74.42 80.9 0 top
CP28  2.2uF  [C0402]  74.42 82.42 0 top
CP29  1uF  [C0402]  72.14 89.66 45 top
CP30  1uF  [C0402]  62.1 88.14 135 top
CP31  2.2uF  [C0402]  74.42 83.95 0 top
CP32  2.2uF  [C0402]  74.42 89.41 0 top
CP33  2.2uF  [C0402]  74.42 84.84 0 top
CP34  2.2uF  [C0402]  74.42 90.93 0 top
CP35  2.2uF  [C0402]  74.42 86.54 0 top
CP36  2.2uF  [C0402]  74.42 92.46 0 top
CP37  2.2uF  [C0402]  74.42 87.88 0 top
CP38  2.2uF  [C0402]  74.42 93.98 0 top
CP48  100nF-50V  [C0402]  25.4 86.11 0 top
CP49  10uF  [C0603]  92.46 56.9 90 top
CP50  10uF-16V  [C0603]  83.44 55.63 270 top
CP51  NC/100nF  [C0402]  88.65 53.34 90 top
CP54  100pF  [C0402]  85.85 52.07 0 top
CP129  100nF-16V  [C0603]  58.17 48.51 90 top
CP130  22uF-50V  [CA430H540]  52.83 43.05 270 top
CP131  10uF-50V  [C0603]  56.01 43.94 90 top
CP132  4.7uF-50V  [C0402]  57.28 43.94 90 top
CP133  NC  [C0402]  67.82 45.21 0 top
CP134  47uF-16V  [C0805]  60.33 50.93 270 top
CP135  1uF  [C0402]  79.12 69.47 180 top
CP136  2.2uF  [C0402]  84.45 65.91 0 top
CP137  2.2uF  [C0402]  80.52 65.53 270 top
CP138  2.2uF  [C0402]  79.12 70.36 180 top
CP139  4.7uF  [C0402]  84.96 67.56 270 top
CP140  NC/22uF  [C0603]  89.28 65.79 270 top
CP141  10uF  [C0603]  90.68 71.63 0 top
CP143  NC/22uF  [C0603]  90.55 65.79 270 top
CP144  10uF  [C0603]  90.68 70.23 0 top
CP145  4.7uF  [C0402]  84.89 71.53 90 top
CP146  4.7uF  [C0402]  83.82 72.64 90 top
CP147  NC/22uF  [C0603]  86.61 74.04 270 top
CP148  10uF  [C0603]  85.34 74.04 270 top
CP149  NC/100nF  [C0402]  83.06 65.41 270 top
CP155  1uF  [C0402]  28.32 90.04 90 top
CP156  100nF-50V  [C0402]  29.11 77.57 0 top
CP157  10uF-50V  [C0603]  29.11 76.43 0 top
CP158  100nF-16V  [C0402]  49.63 71.6 270 top
CP159  47uF-16V  [C0805]  54.51 71.96 90 top
CP161  47uF-16V  [C0805]  62.23 50.93 270 top
CP162  100nF-16V  [C0402]  58.04 51.05 90 top
CP163  1uF-16V  [C0402]  59.05 51.05 90 top
CP164  NC-22nF  [C0402]  162.05 35.05 0 top
CP165  2.2uF-16V  [C0603]  159.64 28.7 0 top
CP166  2.2uF  [C0402]  160.15 35.05 0 top
CP167  NC  [C0402]  60.38 79.65 0 top
CP172  100uF-50V  [C1210]  32.49 59.08 270 top
CP173  100nF-16V  [C0603]  35.43 67.84 180 top
CP174  47pF  [C0402]  44.75 62.28 0 top
CP175  22uF-50V  [CA430H540]  36.53 58.98 270 top
CP176  47uF-16V  [C0805]  46.28 74.3 90 top
CP177  100nF-16V  [C0402]  43.56 67.59 90 top
CP178  47uF-16V  [C0805]  44.96 67.41 270 top
CP179  1uF-16V  [C0402]  44.81 74.27 270 top
CP180  10uF-50V  [C0603]  32.61 65.1 270 top
CP181  100nF-50V  [C0603]  31.34 65.1 270 top
CP184  22uF-50V  [CA430H540]  33.53 44.7 270 top
CP185  100nF-16V  [C0603]  38.86 49.28 90 top
CP186  10uF-50V  [C0603]  36.7 45.59 90 top
CP187  4.7uF-50V  [C0402]  37.97 45.59 90 top
CP188  NC  [C0402]  48.9 46.35 0 top
CP189  47uF-16V  [C0805]  40.39 52.58 270 top
CP190  47uF-16V  [C0805]  38.73 52.58 270 top
CP191  1uF-16V  [C0402]  43.18 51.31 90 top
CP192  100nF-16V  [C0402]  42.29 51.31 90 top
CP193  20pF  [C0402]  65.02 55.37 270 top
CP194  4.7uF-16V  [C0603]  64.01 59.18 90 top
CP195  10uF  [C0603]  72.14 55.88 0 top
CP196  100nF  [C0402]  69.22 55.75 180 top
CP197  2.2uF-16V  [C0603]  50.8 97.66 0 top
CP198  2.2uF  [C0402]  57.78 97.79 90 top
CP199  NC-22nF  [C0402]  57.15 95.38 180 top
CP200  22uF-50V  [C0805]  41.5 87.6 180 top
CP201  10uF-50V  [C0603]  37.24 86.89 0 top
CP202  100nF-50V  [C0402]  37.24 88.04 0 top
CP203  2.2uF-16V  [C0402]  41.12 97.97 180 top
CP204  100nF-16V  [C0402]  41.12 96.7 180 top
CP205  47uF-16V  [C0805]  159.64 27.18 180 top
CP206  47uF-16V  [C0805]  176.78 24.77 270 top
CP207  100nF-16V  [C0402]  161.8 27.94 90 top
CP208  1uF-16V  [C0402]  176.78 26.92 180 top
CP209  NC  [C0603]  59.59 87.78 180 bottom
CP210  20pF  [C0402]  43.88 76.94 270 top
CP211  10uF-16V  [C0603]  44.78 86.41 180 top
CP212  100nF-16V  [C0402]  45.09 85.34 180 top
CP213  4.7uF-16V  [C0603]  44.88 82.78 90 top
CS7  100nF  [C0402]  115.19 44.32 270 bottom
CT1  100nF  [C0402]  29.21 114.94 0 top
CT2  100nF  [C0402]  26.29 118.87 270 bottom
CT3  220nF  [C0402]  29.72 116.84 270 top
CT4  220nF  [C0402]  28.83 116.84 270 top
CT5  100nF-50V  [C0402]  25.4 118.87 270 bottom
CT6  100nF  [C0402]  26.16 108.84 90 top
CT7  1uF  [C0402]  25.27 108.84 90 top
CT8  1uF  [C0402]  26.92 106.68 180 top
CT9  10nF  [C0402]  25.91 120.78 180 top
CT10  100nF-50V  [C0402]  21.08 118.87 90 bottom
CT11  22nF  [C0402]  24.51 118.87 270 bottom
CT12  100nF  [C0402]  24.38 108.84 270 top
CT13  18pF  [C0402]  26.63 128.52 0 top
CT14  100nF  [C0402]  23.37 108.84 90 top
CT15  18pF  [C0402]  27.05 132.59 270 top
CT16  100nF  [C0402]  27.05 127.13 90 top
CT17  10nF  [C0402]  25.91 123.06 45 top
CT18  100nF  [C0402]  18.67 126.24 90 top
CT19  10nF  [C0402]  20.19 122.17 135 top
CT20  18pF  [C0402]  18.67 131.7 270 top
CT21  18pF  [C0402]  19.09 127.64 180 top
CT22  22nF  [C0402]  27.18 118.87 90 bottom
CT23  330pF  [C0402]  17.14 131.7 270 top
CT24  1uF  [C0402]  20.19 118.87 90 bottom
CT25  100nF  [C0402]  17.14 128.78 270 top
CT26  100nF  [C0402]  20.19 108.84 270 top
CT27  1uF  [C0402]  16.13 119.76 270 top
CT28  100nF  [C0402]  15.11 119.76 270 top
CT29  100nF  [C0402]  16.13 117.47 0 top
CT30  1uF  [C0402]  16.13 118.36 0 top
CT31  100nF  [C0402]  14.86 111.25 90 top
CT32  18pF  [C0402]  14.99 115.57 90 top
CT33  18pF  [C0402]  14.99 113.67 270 top
CT34  4.7uF  [C0603]  13.08 107.57 180 top
CT35  100nF  [C0402]  13.21 106.43 180 top
CT36  4.7uF  [C0603]  12.32 110.87 90 top
CT37  100nF  [C0402]  13.72 118.36 0 top
CT38  4.7nF  [C0402]  15.49 109.35 180 top
CT39  4.7nF  [C0402]  17.4 109.35 0 top
CT40  1uF  [C0402]  29.21 109.22 180 top
CU1  1uF-16V  [C0402]  214.22 129.87 270 top
CU2  22uF-16V  [C0805]  213.03 135.71 270 top
CU3  100nF-16V  [C0402]  211.96 132.33 0 top
CU4  100nF  [C0402]  201.17 131.83 180 top
CU5  1uF-16V  [C0402]  167.26 20.07 180 top
CU6  10uF-16V  [C0603]  167.51 14.61 180 top
CU7  100nF-16V  [C0402]  167.51 13.34 180 top
CU8  1uF-16V  [C0402]  147.96 16.89 270 top
CU9  22uF-16V  [C0805]  158.12 13.46 270 top
CU10  100nF-16V  [C0402]  159.51 13.08 270 top
CU11  18pF-C0G  [C0402]  152.02 23.62 0 top
CU12  18pF-C0G  [C0402]  148.21 23.62 180 top
CU13  22uF-16V  [C0805]  150.62 14.86 0 top
CU14  100nF-16V  [C0402]  150.88 13.59 0 top
CU15  22uF  [C0805]  147.96 31.62 270 top
CU16  4.7uF  [C0402]  148.21 27.56 0 top
CU17  100nF  [C0402]  148.34 28.96 270 top
CU20  10nF  [C0402]  148.21 24.64 0 top
CU21  100nF  [C0402]  181.48 52.45 270 bottom
CW14  33pF  [C0402]  220.6 123.44 270 top
CW15  100nF  [C0402]  175.64 47.5 270 bottom
CW16  100nF  [C0402]  160.4 39.75 270 top
CW17  100nF  [C0402]  177.55 39.5 180 top
CW18  33pF  [C0402]  224.28 123.95 0 top
CW19  33pF  [C0402]  226.44 123.95 0 top
CW20  33pF  [C0402]  228.73 136.65 0 top
CW21  220nF  [C0402]  222.25 123.95 0 top
CW22  NC/100pF  [C0402]  125.35 118.49 90 bottom
CW23  100nF  [C0402]  127.76 123.95 0 bottom
CW24  1uF  [C0402]  130.94 119.13 180 bottom
CW25  NC/100nF  [C0402]  132.46 123.32 180 bottom
CW26  NC/1uF  [C0402]  133.73 123.06 0 top
CW27  470nF  [C0402]  130.63 123.93 180 bottom
CW28  2.2uF  [C0402]  127.13 117.22 270 bottom
CW29  470nF  [C0402]  130.56 117.22 270 bottom
CW30  NC/20pF  [C0402]  130.3 126.24 90 top
CW31  4.7uF  [C0402]  133.48 124.21 0 bottom
CW32  NC/20pF  [C0402]  130.94 127.64 0 top
CW33  100nF  [C0402]  128.02 117.22 270 bottom
CW34  100nF  [C0402]  132.08 121.92 90 bottom
CW35  NC  [C0402]  123.06 123.57 0 top
CW36  18pF  [C0402]  127 131.06 0 top
CW37  NC  [C0402]  130 132.84 0 top
CW38  NC  [C0402]  130 135.64 0 top
CW39  18pF  [C0402]  125.09 131.06 0 top
CW40  10uF  [C0603]  128.65 131.06 90 top
CW41  NC  [C0402]  136.95 132.84 180 top
CW42  NC  [C0402]  136.95 135.64 180 top
CW43  4.7uF  [C0402]  122.94 118.36 0 top
CW44  4.7uF  [C0402]  124.84 115.7 90 top
CW45  100nF  [C0402]  158.88 45.59 0 top
D1  NC/SM8J22A  [SOD1000_1350H485]  23.5 29.21 180 top
D2  SS34  [SOD591_686H234]  37.01 82.93 0 top
D3  MM1Z3V6  [SOD155_270H118]  37.08 96.75 0 top
D4  ESD5451X-2-TR  [ESD0402]  108.46 41.4 270 top
D5  ESD5451X-2-TR  [ESD0402]  11.23 9.93 270 top
D6  IN5819  [SOD323]  208.08 131.11 270 top
D7  ESD5451X-2-TR  [ESD0402]  9.14 49.28 180 top
D8  ESD5451X-2-TR  [ESD0402]  7.11 49.28 180 top
D9  ESD5451X-2-TR  [ESD0402]  15.24 47.62 90 top
D10  ESD5451X-2-TR  [ESD0402]  12.19 49.28 0 top
D11  AZ1345-04F  [RCLAMP0524P]  137.03 11.3 0 top
D12  AZ1345-04F  [RCLAMP0524P]  134.62 10.41 180 top
D13  AZ1345-04F  [RCLAMP0524P]  131.57 10.41 180 top
D24  NC-1N5819HW  [SOD123]  33.02 27.05 90 top
D25  BAT54C  [SOT3P95B130_290H103]  39.37 14.73 90 top
D26  MM3Z5V1  [SOD155_270H118]  43.81 15.11 0 top
D27  NC-MM3Z5V1  [SOD155_270H118]  81.66 54.48 270 top
D28  BAT54C  [SOT3P95B130_290H103]  34.54 18.41 0 top
D29  MM3Z5V1  [SOD155_270H118]  30.48 19.68 90 top
D30  NC-BAT54C  [SOT3P95B130_290H103]  36.96 35.81 0 top
D31  NC-MM3Z5V1  [SOD155_270H118]  32.77 35.43 270 top
D32  NC-BAT54C  [SOT3P95B130_290H103]  75.06 53.21 270 top
D33  NC-MM3Z5V1  [SOD155_270H118]  67.82 50.55 270 top
D34  NC-BAT54C  [SOT3P95B130_290H103]  42.16 35.81 180 top
D35  NC-MM3Z5V1  [SOD155_270H118]  36.96 38.86 180 top
D36  NC-BAV99  [SOT3P95B130_290H103]  45.47 34.8 180 top
D37  AS3BD  [SMB]  62.53 67.39 270 top
D38  ESD5451X-2-TR  [ESD0402]  63.37 138.94 180 top
D39  ESD5451X-2-TR  [ESD0402]  61.47 138.94 0 top
D40  ESD5451X-2-TR  [ESD0402]  73.41 138.94 180 top
D41  ESD5451X-2-TR  [ESD0402]  71.5 138.94 0 top
D45  XBS104S14  [SOD155_270H118]  51.82 99.57 0 top
D46  XBS104S14  [SOD155_270H118]  51.82 101.73 0 top
D47  ESD5451X-2/TR  [ESD0402]  92.58 129.54 180 top
D48  ESD5451X-2/TR  [ESD0402]  82.93 135.51 270 top
D49  ESD5451X-2/TR  [ESD0402]  88.65 129.54 0 top
D50  ESD5451X-2/TR  [ESD0402]  86.36 129.54 0 top
D51  ESD5451X-2-TR  [ESD0402]  84.2 34.29 90 top
D52  ESD5451X-2-TR  [ESD0402]  108.46 44.83 90 top
D53  ESD5451X-2-TR  [ESD0402]  84.2 28.32 90 top
D54  ESD5451X-2-TR  [ESD0402]  16.61 9.86 270 top
D55  ESD5451X-2-TR  [ESD0402]  84.33 40.26 0 top
DC6  ESD9B5VL-2-TR  [ESD0402]  212.72 17.02 0 top
DC7  ESD9B5VL-2-TR  [ESD0402]  214.63 17.02 180 top
DC8  ESD9B5VL-2-TR  [ESD0402]  216.53 17.02 180 top
DC9  ESD9B5VL-2-TR  [ESD0402]  222.25 17.02 180 top
DC10  ESD9B5VL-2-TR  [ESD0402]  224.16 17.02 180 top
DE1  LED-0805-R  [LED0805]  236.47 34.92 90 top
DE2  LED-0805-R  [LED0805]  241.3 30.99 90 top
DE3  LED-0805-R  [LED0805]  241.3 34.92 90 top
DH1  AZ1345-04F  [RCLAMP0524P]  203.71 13.21 180 top
DH2  AZ1345-04F  [RCLAMP0524P]  200.66 13.21 180 top
DH3  ESD9B5VL-2-TR  [ESD0402]  191.64 13.21 0 top
DH4  ESD9B5VL-2-TR  [ESD0402]  194.82 13.21 0 top
DH5  ESD9B5VL-2-TR  [ESD0402]  197.1 13.21 0 top
DH6  ESD9B5VL-2-TR  [ESD0402]  207.26 13.21 180 top
DH7  ESD5451X-2/TR  [ESD0402]  193.17 13.72 270 top
DH8  SS24  [SOD362_432H229]  206.5 16.51 270 top
DH9  XBS104S14  [SOD155_270H118]  189.48 18.67 270 top
DH10  ESD5451X-2/TR  [ESD0402]  140.21 11.18 270 top
DL1  XBS104S14  [SOD155_270H118]  114.3 38.1 180 top
DL2  XBS104S14  [SOD155_270H118]  156.44 111.2 180 top
DL3  NC-SS16F  [SOD250_380H100]  95.63 42.93 0 bottom
DP1  NC/6A10  [SOD591_686H234]  14.35 18.8 270 top
DP2  NC/AS3BD  [SMB]  54 80.24 270 top
DP5  NC/PTVSHC3N12VU  [DFN3P130B200_200H65]  57.56 82.5 270 top
DP13  LED  [LED0603]  53.06 93.62 0 top
DP14  PTVSHC3N4V5B  [DFN3P130B200_200H65]  9.35 119.91 180 top
DU25  ESD5451X-2/TR  [ESD0402]  210.82 17.02 0 top
DU26  ESD9B5VL-2-TR  [ESD0402]  220.34 17.02 180 top
DU27  ESD5451X-2/TR  [ESD0402]  218.44 17.02 180 top
EC1  NC/3300uF-50V  [CA1000H1250_THR]  22.86 41.27 0 top
EC3  10uF-25V  [CA430H540]  14.22 70.23 270 top
ECP1  22uF-50V  [CA430H540]  25.15 76.56 0 top
ESD1  uClamp5501ZV  [SOD269_426H222]  53.39 64.9 90 top
ESD5  ESD9B5VL-2/TR  [ESD0402]  117.05 10.34 0 top
ESD6  ESD9B5VL-2/TR  [ESD0402]  119.21 10.34 0 top
ESD7  ESD5451X-2/TR  [ESD0402]  127.89 40.39 270 top
ESD8  ESD5451X-2/TR  [ESD0402]  124.08 40.39 270 top
ESD9  ESD5451X-2/TR  [ESD0402]  112.1 20.63 90 top
ESD10  ESD5451X-2/TR  [ESD0402]  103.63 36.2 0 top
ESD11  RCLAMP3324P  [RA9P50B100_250H58]  93.6 35.43 90 top
ESD12  RCLAMP3324P  [RA9P50B100_250H58]  108.41 20.24 270 top
ESD13  RCLAMP3324P  [RA9P50B100_250H58]  96.65 35.43 90 top
ESD14  RCLAMP3324P  [RA9P50B100_250H58]  105.36 20.24 270 top
ESD15  RCLAMP3324P  [RA9P50B100_250H58]  99.69 35.43 90 top
ESD16  ESD9B5VL-2/TR  [ESD0402]  165.35 133.1 180 top
ESD17  ESD9B5VL-2/TR  [ESD0402]  163.32 133.1 180 top
ESD20  ESD5451X-2/TR  [ESD0402]  169.54 133.1 180 top
ESD21  ESD5451X-2/TR  [ESD0402]  167.51 134.11 0 top
ESD22  ESD5451X-2/TR  [ESD0402]  167 123.32 270 top
ESD23  ESD5451X-2/TR  [ESD0402]  171.32 133.48 270 top
ESD24  RCLAMP3324P  [RA9P50B100_250H58]  171.07 93.22 270 top
ESD25  RCLAMP3324P  [RA9P50B100_250H58]  170.94 122.56 270 top
ESD26  RCLAMP3324P  [RA9P50B100_250H58]  168.02 93.22 270 top
ESD27  RCLAMP3324P  [RA9P50B100_250H58]  174.12 122.56 270 top
ESD28  RCLAMP3324P  [RA9P50B100_250H58]  164.97 93.22 270 top
ESD37  ESD9N5BU  [ESD0402]  205.28 134.16 180 top
ESD38  ESD5451X-2-TR  [ESD0402]  209.5 133.88 270 top
ESD39  ESD5451X-2-TR  [ESD0402]  206.68 133.35 90 bottom
ESD40  ESD9N5BU  [ESD0402]  203.25 134.16 0 top
ESD41  ESD5451X-2-TR  [ESD0402]  206.68 133.35 90 top
ESD42  ESD9N5BU  [ESD0402]  175.64 12.57 180 top
ESD43  ESD9N5BU  [ESD0402]  173.74 12.57 0 top
ESD44  ESD5451X-2/TR  [ESD0402]  167.51 12.45 180 top
ESD45  ESD9N5BU  [ESD0402]  162.43 12.32 0 top
ESD46  ESD5451X-2/TR  [ESD0402]  160.4 13.08 270 top
ESD47  ESD9N5BU  [ESD0402]  164.34 12.32 180 top
ESD48  ESD9N5BU  [ESD0402]  155.19 12.7 180 top
ESD49  ESD5451X-2/TR  [ESD0402]  150.88 12.7 0 top
ESD50  ESD9N5BU  [ESD0402]  153.29 12.7 0 top
ESD54  ESD5451X-2/TR  [ESD0402]  222.25 124.97 180 top
ESD55  ESD5451X-2/TR  [ESD0402]  224.28 124.97 180 top
ESD56  ESD5451X-2/TR  [ESD0402]  228.73 137.54 180 top
ESD57  ESD5451X-2/TR  [ESD0402]  226.44 124.97 180 top
ESD70  ESD5451X-2-TR  [ESD0402]  103.76 136.53 0 top
ESD71  ESD5451X-2-TR  [ESD0402]  105.66 136.53 180 top
ESD72  ESD5451X-2-TR  [ESD0402]  99.31 136.53 180 top
ESD73  ESD5451X-2-TR  [ESD0402]  97.41 136.53 0 top
ESD74  ESD5451X-2/TR  [ESD0402]  46.86 129.54 90 top
ESD75  ESD5451X-2/TR  [ESD0402]  46.86 127.51 270 top
ESD76  RCLAMP0521P-N  [ESD0402]  59.94 7.37 0 top
ESD77  RCLAMP0521P-N  [ESD0402]  61.85 7.37 180 top
ESD78  RCLAMP0521P-N  [ESD0402]  65.79 7.49 0 top
ESD79  RCLAMP0521P-N  [ESD0402]  67.69 7.49 180 top
ESD80  RCLAMP0521P-N  [ESD0402]  70.23 7.49 0 top
ESD81  RCLAMP0521P-N  [ESD0402]  72.14 7.49 180 top
ESD82  ESD5451X-2-TR  [ESD0402]  4.83 69.85 270 top
ESD83  ESD5451X-2-TR  [ESD0402]  4.83 65.66 90 top
ESD84  ESD5451X-2-TR  [ESD0402]  4.83 61.85 90 top
ESD85  ESD5451X-2-TR  [ESD0402]  4.83 63.75 270 top
ESD86  ESD5451X-2-TR  [ESD0402]  104.39 59.82 180 top
ESD87  ESD5451X-2-TR  [ESD0402]  102.36 59.82 0 top
ESD88  ESD5451X-2-TR  [ESD0402]  97.54 59.82 0 top
ESD89  ESD5451X-2-TR  [ESD0402]  99.57 59.82 180 top
ESD110  ESD5451X-2/TR  [ESD0402]  96.52 112.52 90 top
ESD111  ESD5451X-2/TR  [ESD0402]  93.98 112.52 90 top
ESD112  ESD5451X-2/TR  [ESD0402]  91.44 112.52 90 top
ESD113  ESD5451X-2/TR  [ESD0402]  88.9 112.52 90 top
ESD114  ESD5451X-2/TR  [ESD0402]  96.52 99.57 90 top
ESD116  ESD5451X-2/TR  [ESD0402]  93.98 99.57 90 top
ESD118  ESD5451X-2/TR  [ESD0402]  109.22 112.52 90 top
ESD119  ESD5451X-2/TR  [ESD0402]  104.14 112.52 90 top
ESD120  ESD5451X-2/TR  [ESD0402]  106.68 112.52 90 top
ESD121  ESD5451X-2/TR  [ESD0402]  101.6 112.52 90 top
ESD122  ESD5451X-2/TR  [ESD0402]  101.6 99.57 90 top
ESD123  ESD5451X-2/TR  [ESD0402]  106.68 99.57 90 top
ESD124  ESD5451X-2/TR  [ESD0402]  104.14 99.57 90 top
ESD125  ESD5451X-2/TR  [ESD0402]  109.22 99.57 90 top
ESD127  ESD5451X-2/TR  [ESD0402]  116.2 112.52 90 top
ESD128  ESD5451X-2/TR  [ESD0402]  119.38 112.52 90 top
ESD129  ESD5451X-2/TR  [ESD0402]  114.3 112.52 90 top
ESD130  ESD5451X-2/TR  [ESD0402]  121.92 99.57 90 top
ESD131  ESD5451X-2/TR  [ESD0402]  116.84 99.57 90 top
ESD132  ESD5451X-2/TR  [ESD0402]  119.38 99.57 90 top
ESD133  ESD5451X-2/TR  [ESD0402]  114.3 99.57 90 top
ESD134  ESD9B5VL-2/TR  [ESD0402]  134.11 101.98 0 top
ESD135  ESD5451X-2/TR  [ESD0402]  132.08 101.98 0 top
ESD136  ESD5451X-2/TR  [ESD0402]  126.11 101.98 0 top
ESD137  ESD5451X-2/TR  [ESD0402]  128.14 101.98 0 top
ESD138  ESD9B5VL-2/TR  [ESD0402]  136.27 101.98 0 top
ESD139  ESD5451X-2/TR  [ESD0402]  107.7 75.18 180 top
ESD140  ESD5451X-2-TR  [ESD0402]  87.5 11.94 180 top
ESD141  ESD5451X-2/TR  [ESD0402]  80.39 138.94 90 top
ESD142  ESD9B5VL-2/TR  [ESD0402]  180.85 93.34 270 top
ESD143  ESD9B5VL-2/TR  [ESD0402]  180.85 97.16 270 top
ESD144  ESD9B5VL-2/TR  [ESD0402]  180.85 100.97 270 top
ESD145  ESD9B5VL-2/TR  [ESD0402]  180.85 99.06 270 top
ESD146  ESD9B5VL-2/TR  [ESD0402]  180.85 95.25 270 top
EU1  ESD73034D  [ESD10P50B100_250H55]  178.18 12.95 180 top
FB1  90@100M  [R0805]  224.54 115.82 90 top
FB2  90@100M  [R0805]  224.41 61.59 90 top
FB3  90@100M  [R0805]  224.54 119.76 90 top
FB4  90@100M  [R0805]  224.41 65.79 90 top
FB7  600R@100M-1A  [L0603]  150.5 32.38 180 top
FB8  600R@100M-1A  [L0603]  122.05 135.25 0 top
FB10  120R@100M-1A  [L0603]  23.88 106.93 180 top
FB11  120R@100M-1A  [L0603]  19.05 108.46 270 top
FB12  120R@100M-1A  [L0603]  13.08 108.84 180 top
FB13  120R@100M-1A  [L0603]  13.72 110.87 90 top
FB14  120R@100M-1A  [L0603]  31.75 125.09 180 top
FB15  600R@100M-1A  [L0603]  60.58 28.7 0 top
FB16  90@100M  [R0805]  41.91 120.27 0 top
FB17  90@100M  [R0805]  93.6 12.83 270 top
FBM1  600R@100M-1A  [L0603]  55.75 28.19 270 top
H4  NC-HOLE  [MTH635D320]  156.28 139.32 90 top
H5  NC-HOLE  [MTH635D320]  227.06 37.33 0 top
H6  NC-HOLE  [MTH635D320]  125.58 26 0 top
H7  NC-HOLE  [MTH635D320]  227.06 91.43 90 top
H8  NC-HOLE  [MTH635D320]  101.58 4.15 0 top
H9  NC-HOLE  [MTH635D320]  242.84 127.01 270 top
H11  NC-HOLE  [MTH635D320]  88.01 84.07 0 top
H12  NC-HOLE  [MTH635D320]  243.2 140.31 0 top
H13  NC-HOLE  [MTH635D320]  3 3 0 top
H14  NC-HOLE  [MTH635D320]  180.27 117.47 90 top
H17  NC-HOLE  [MTH635D320]  242.84 72.91 0 top
H18  NC-HOLE  [MTH635D320]  3 140.31 0 top
H19  NC-HOLE  [MTH635D320]  243.2 3 0 top
HPCON2  PJ-327F  [HP5B650_1400H500]  89.53 137.16 0 top
I2S-CON2  CON2X4-2.54-M  [HDR2_4P254B500_1016H254]  184.15 96.52 0 top
J1  DCIN  [PWR_JACK]  1.27 26.04 270 top
J3  SIM-SLOT  [SDC10B1630_1640H220]  227.97 131.7 270 bottom
J8  NC/OWA-OPTICAL  [SPDIF5B965_1360H960]  89.53 3.3 270 top
J10  NC/CON2X6-2.54-M  [HDR2_6P254B500_1524H254]  66.29 38.61 90 top
J11  NC/CON1X3-2.54-F-DIP  [SKT1_3P254B250_782H850]  43.81 10.79 180 top
J12  NC/CON1X3-2.54-F-DIP  [SKT1_3P254B250_782H850]  53.85 9.14 0 top
J16  DC3-2.0MM-8P  [HDR2_4P254B500_1016H920_SMD]  118.11 106.05 180 top
J17  NC/M2_KEY_B  [PCIE77P50B775_2190H420]  203.84 60.2 180 top
J18  MINIPCIE  [PCI54P80B760_3000H400]  169.54 38.61 270 top
J19  CON2X8-2.54-M  [HDR2_8P254B870_2794H900]  17.02 89.92 180 top
J24  CON5  [SKT5P250B700_1500H570_R_THR]  17.78 3.17 0 top
J25  CON5  [HDR1_5P250B570_1500H700]  10.79 40.01 180 top
J26  NC/DC3-2.0MM-14P  [HDR2_7P200B550_2130H560]  74.42 117.47 90 top
J28  CON5  [HDR1_5P250B570_1500H700]  2.92 40.01 180 top
J34  NC/JTAG-SEL  [HDR1_2P254B250_508H254]  160.15 76.33 270 top
J47  CHQ0038D  [TO3B400_400H230_DIP]  79.76 141.73 180 top
J48  NC/CON1X2-2.54-M  [HDR1_2P254B250_508H254]  105.41 72.39 180 top
J57  NC/DC3-2.0MM-14P  [HDR2_7P200B550_2130H560]  80.64 46.35 90 top
J58  2EG01817-D2W-DF  [PCIE_36P100B730_2500H1110_SMD]  179.2 70.61 270 top
J60  NC/12V  [HDR1_2P254B250_508H254]  169.93 82.93 180 top
J61  DC3-2.0MM-8P  [HDR2_4P254B500_1016H920_SMD]  105.41 106.05 180 top
J62  DC3-2.0MM-8P  [HDR2_4P254B500_1016H920_SMD]  92.71 106.05 180 top
J64  CON1X2-2.54-F-DIP  [SKT1_2P254B250_528H850]  174.37 19.81 180 top
J65  NC/DC3-2.0MM-14P  [HDR2_7P200B550_2130H560]  74.42 109.73 90 top
JA1  CON1X2-2.54-F-DIP  [SKT1_2P254B250_528H850]  99.69 78.99 180 top
JC1  TF-SLOT  [SDC13B1450_1472H245]  218.44 7.62 180 top
JC3  DF40HC(3.0)-90DS-0.4V(58)  [SEDSKT90P40B294_2060H290]  234.95 109.22 270 top
JC5  XH2.54MM-2P-M  [HDR1_2P250B570_750H700]  58.42 2.92 270 top
JC6  XH2.54MM-2P-M  [HDR1_2P250B570_750H700]  68.58 3.05 270 top
JC7  XH2.54MM-2P-M  [HDR1_2P250B570_750H700]  78.61 3.05 270 top
JC8  DF40HC(3.0)-90DS-0.4V(58)  [SEDSKT90P40B294_2060H290]  234.95 55.12 270 top
JE1  HFJ11-1G01E  [RJ12P127B1588_2159H1364]  242.57 17.78 90 top
JH1  HDMI-Type-A-SLOT  [HDMI23P50B1215_1500H838]  199.39 5.08 180 top
JH2  CON2X5-2.54-F-SMD  [HDR2_5P254B500_1310H850_SMD]  131.57 107.19 90 top
JL1  DF17(3.0)-80DS-0.5V  [SKT2_40P50B570_2500H350]  113.58 15.08 0 top
JL2  LVDS0_CN_40PIN  [FPC42P50B450_2410H150]  98.82 30.11 0 top
JL3  CTP_CN  [FPC8P100B515_1090H340_B]  126.36 35.81 0 top
JL4  DF17(3.0)-80DS-0.5V  [SKT2_40P50B570_2500H350]  168.28 128.4 180 top
JL5  LVDS0_CN_40PIN  [FPC42P50B450_2410H150]  165.74 98.42 180 top
JL6  CTP_CN  [FPC8P100B515_1090H340_B]  147.19 127.76 180 top
JL7  FPC-40P-0.5MM-B  [FPC42P50B450_2410H150]  136.14 4.32 0 top
JP1  NC/5P_1.25MM  [CON-R5S-P1_3-H1_5-R]  6.6 125.25 180 top
JP2  NC/J_BAT_TS  [BAT_SMD-3]  2.29 125.25 90 top
JP9  JP-12V  [HDR1_2P254B250_508H254]  57.71 67.41 90 top
JP10  KF2EDG-3.81mm  [PWR_2P381B700_842H920]  22.61 18.8 270 top
JU1  Type-C  [USB28P50B865_970H276]  204.26 142.06 180 top
JU3  USB-A-02F  [USB8P200B512_1925H1250]  164.85 1.27 0 top
JU4  USB-A-02F  [USB8P200B512_1925H1250]  154.69 1.27 0 top
JU5  USB3-MICRO-B_4  [USB11P200B1390_1650H700]  178.44 2.54 0 top
JW6  ANT-IPX  [ANT3B300_310H125]  136.53 140.97 180 top
JW7  ANT-IPX  [ANT3B300_310H125]  130.43 140.97 180 top
K1  VOL+  [KEY4B450_450H380]  79.38 29.84 0 top
K2  ENTER  [KEY4B450_450H380]  79.38 14.61 0 top
K3  HOME  [KEY4B450_450H380]  79.38 9.53 0 top
K4  UBOOT  [KEY4B450_450H380]  103.89 40.84 180 top
K5  POWER  [KEY4B450_450H380]  79.38 34.92 0 top
K6  RESET  [KEY4B450_450H380]  103.89 45.92 180 top
K7  VOL-  [KEY4B450_450H380]  79.38 24.77 0 top
K8  MENU  [KEY4B450_450H380]  79.38 19.68 0 top
K9  FUN1  [KEY4B450_450H380]  79.38 40.01 0 top
KM2  NC/MCU-RST-KEY  [KEY4B450_450H380]  55.5 32.51 0 top
L1  NC/220uH@10A-TCH6826A-56UH-B  [RD2B1150_2400H2400]  23.5 60.96 0 top
L2  HPPC06030B-6R8M-AU  [LP680_730H280]  39.45 72.26 0 top
L5  HPPC06030B-6R8M-AU  [LP680_730H280]  34.29 51.69 90 top
L6  HEI252012A-2R2M-PAU-2A  [LP200_250H100]  70.36 58.17 270 top
L9  NC/ICMF112P900MFR  [LC4P55B100_125H50]  204.26 132.64 180 top
L10  NC/ICMF112P900MFR  [LC4P55B100_125H50]  174.75 14.22 0 top
L11  NC/ICMF112P900MFR  [LC4P55B100_125H50]  163.45 13.84 0 top
L12  NC/ICMF112P900MFR  [LC4P55B100_125H50]  154.31 14.35 0 top
L14  HPPC06030B-6R8M-AU  [LP680_730H280]  53.85 50.04 90 top
L15  BLM18AG601SH1  [L0603]  30.86 117.22 270 top
L16  BLM15AG601SH1  [L0402]  24.77 120.78 180 bottom
L17  56nH  [L0603]  26.34 124.59 180 top
L18  180nH  [L0603]  27.05 130.3 270 top
L19  56nH  [L0603]  19.38 123.7 180 top
L20  180nH  [L0603]  18.67 129.41 270 top
L21  BLM15AG102SH1  [L0402]  17.14 126.87 90 top
L22  BLM18AG601SH1  [L0603]  13.21 119.51 0 top
L23  BLM15AG601SH1  [L0402]  13.72 117.47 180 top
L24  HEI252012A-2R2M-PAU-2A  [LP200_250H100]  47.17 83.16 90 top
LC1  ACT45B  [LC4B320_450H280]  60.96 11.05 270 top
LC2  ACT45B  [LC4B320_450H280]  66.67 11.43 270 top
LC3  ACT45B  [LC4B320_450H280]  71.12 11.43 270 top
LE1  2.2uH-1A  [LP160_200H100]  208.41 34.8 180 top
LED2  APSYS-5V  [LED0805]  48.84 59.36 270 top
LED3  3V3-STBY  [LED0805]  40.18 103.33 90 top
LED4  VCC-5V  [LED0805]  47.07 59.36 270 top
LED5  DCIN-12V  [LED0805]  36.8 77.32 0 top
LED8  LET  [LED0805]  158.62 32.26 90 top
LED9  GLED  [LED0603]  111.51 44.83 0 top
LED10  GLED  [LED0603]  140.46 109.86 180 top
LG1  56nH  [L0603]  120.7 131.95 90 top
LINEINCON1  HP-JACK  [PJ327F]  47.12 143.26 270 top
LL1  10uH-DCR<0.1R-2A  [LP200_250H100]  94.13 43.13 180 top
LP1  1.0uH/4A  [LP300_300H100]  70.23 77.6 270 top
LP2  1.0uH/3A  [LP200_250H120]  65.41 92.46 90 top
LP3  1.0uH/1.5A  [LP200_250H120]  69.22 92.71 90 top
LP4  1.0uH/3A  [LP200_250H120]  59.23 88.04 0 top
LP7  2.2uH/2A  [LP200_250H100]  89.92 55.88 0 top
LP17  1.0uH/2A  [LP200_250H120]  87.12 67.56 270 top
LP18  1.0uH/3A  [LP200_250H120]  87.5 70.87 0 top
LP19  1.0uH/2A  [LP200_250H120]  81.92 73.66 90 top
LW2  NC/2.2uH/0.6A  [LP200_250H120]  133.6 117.35 0 bottom
LW3  2.2uH  [LP200_250H100]  122.94 116.33 270 top
MIC1  Micphone  [MIC_600X270]  105.41 139.19 180 top
MIC2  Micphone  [MIC_600X270]  99.06 139.19 180 top
NOREF  -  []  0 141.78 0 top
NOREF#2  -  []  142.11 77.85 0 top
NOREF#3  -  [unnamed#2]  240.16 5.84 0 top
NOREF#4  -  [unnamed#2]  6.35 135.89 0 top
NOREF#5  -  []  1.52 0 90 top
